# EAGLE board round-display-v1.1 (EAGLE 9.6.2)
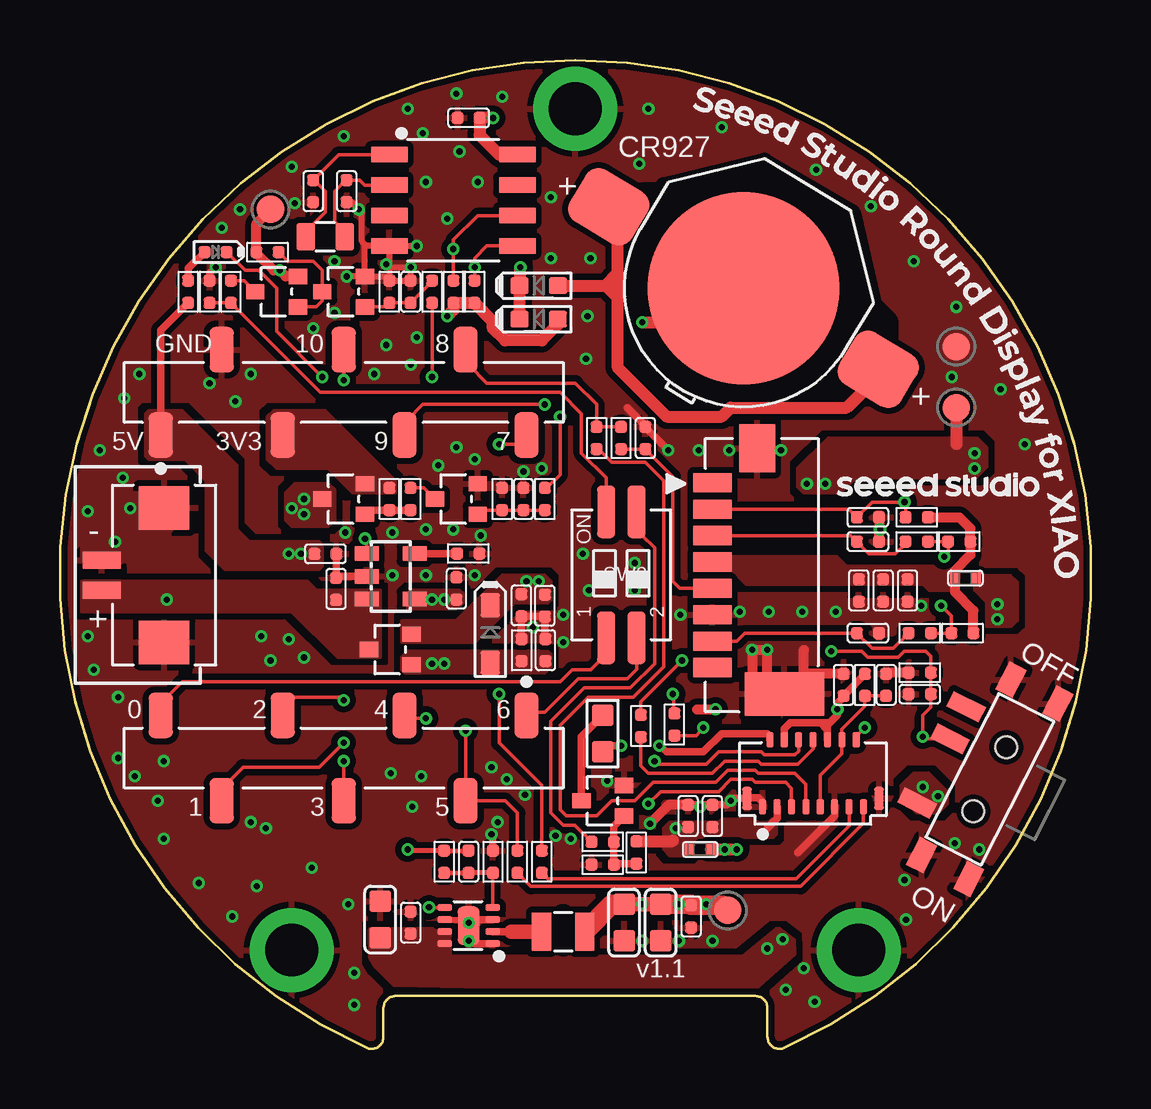
[diagram p0: board, top side]
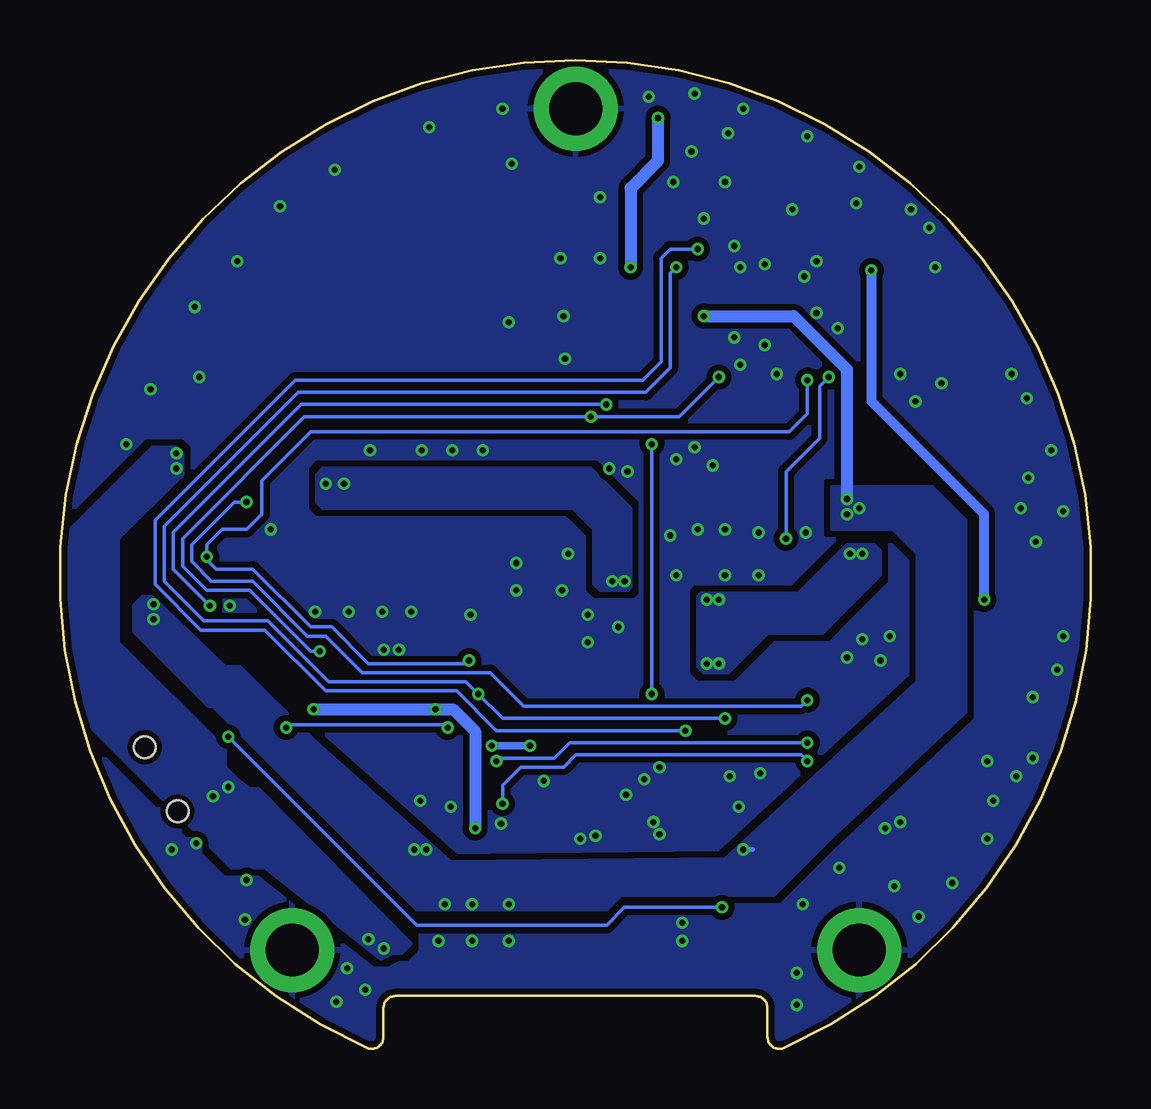
[diagram p1: board, bottom side, seen from below]

Size 42.96 x 41.2 mm. Coordinates in mm from the lower left corner, seen from the top.
Outline: 12.78,0.04 arc114 13.48,0.5 13.48,1.7 arc-90 13.98,2.2 28.98,2.2 arc-90 29.48,1.7 29.48,0.5 arc114 30.18,0.04 arc312 12.78,0.04
Copper layers (1*16): Top 0.035mm / dielectric 1.5mm / Bottom 0.035mm
Design rules "SeeedStudio_2layer_DRU_no_angle_20140221": minimum track width 1mil, minimum drill 10mil, track to track 6mil, track to pad 6mil, pad to pad 6mil, via to via 6mil, smd to smd 0mil, copper to edge 10mil, drill to drill 10mil, minimum pad ring 4mil, minimum via ring 4mil, stop-mask expansion 2mil, vias tented up to drill 25mil, thermal gap 10mil
tRestrict: area 23.9,26.6 to 34.4,35.6; area 25.2,30.8 to 33.9,37; area 20.8,4.1 to 21.1,5.8; area 10.5,33.3 to 11.6,34.3

## Footprints (pad centres in the part's own frame; a part is rotated, then mirrored left to right if it is on the bottom)
BAT2P-SMD-15.3X8.6X2.9MM = smd 3 x 2.5: 1+ -6.55,0; 2+ 6.55,0 | smd 8 x 8: 3- 0,0
C0402 = smd 0.5 x 0.5: 1 -0.463,0; 2 0.463,0
C0603 = smd 0.889 x 0.889: 1 -0.762,0; 2 0.762,0
LED-0402 = smd 0.5 x 0.5: + 0.463,0; - -0.463,0
SOD-323 = smd 1 x 0.8: + 1.2,0; - -1.2,0
ESD-0402 = smd 0.5 x 0.5: 1 -0.463,0; 2 0.463,0
SOD-523 = smd 0.762 x 0.7: + 0.8,0; - -0.8,0
F0402 = smd 0.445 x 0.508: 1 -0.445,0; 2 0.445,0
HW2+2P-SMD-1.25 = smd 0.7 x 1.6: 1 -0.625,0; 2 0.625,0 | smd 1.82 x 2.1: P1 -2.8,-2.6; P2 2.8,-2.6
MICRO-SD8+2P-SMD-1.1-11.41X4.9X3MM = smd 1.6 x 0.8: P1 0,3.85; P2 0,2.75; P3 0,1.65; P4 0,0.55; P5 0,-0.55; P6 0,-1.65; P7 0,-2.75; P8 0,-3.85 | smd 1.5 x 2: S1 1.86,5.28 | smd 3.3 x 1.8: S2 3,-4.95
H7-2.54-18.28X2.5X5MM = smd 1.02 x 1.9: 1 -7.62,-1.78; 2 -5.08,1.78; 3 -2.54,-1.78; 4 0,1.78; 5 2.54,-1.78; 6 5.08,1.78; 7 7.62,-1.78
H1P-3.5/2.2MM-PASTE = drill 2.2 pad 3.5: 1 0,0
FPC15P-0.6-6.1X2.83X1MM = smd 0.3 x 0.65: 1 -2.1,-1.4; 2 -1.8,1.4; 3 -1.5,-1.4; 4 -1.2,1.4; 5 -0.9,-1.4; 6 -0.6,1.4; 7 -0.3,-1.4; 8 0,1.4; 9 0.3,-1.4; 10 0.6,1.4; 11 0.9,-1.4; 12 1.2,1.4; 13 1.5,-1.4; 14 1.8,1.4; 15 2.1,-1.4 | smd 0.4 x 0.95: 16 -2.75,-1.05; 17 2.75,-1.05
L201610 = smd 0.8 x 1.6: 1 -0.9,0; 2 0.9,0
SOT-323 = smd 0.762 x 0.635: 1 0.889,-0.635; 2 0.889,0.635; 3 -0.889,0
R0402 = smd 0.5 x 0.5: 1 -0.463,0; 2 0.463,0
R0603 = smd 0.889 x 0.889: 1 -0.762,0; 2 0.762,0
SW7-SMD-6.7X2.6X1.4MM-90D = smd 0.7 x 1.5: 1 -2.25,2.25; 2 0.75,2.25; 3 2.25,2.25 | smd 1.3 x 0.8: P1 -4.1,1.1; P2 -4.1,-1.1; P3 4.1,-1.1; P4 4.1,1.1 | hole 0.9: -1.5,0; 1.5,0
SW4-SMD-1.27-5.4X4.14X2.3MM = smd 0.76 x 2.2: 1 -0.635,-2.625; 2 0.635,-2.625; 3 0.635,2.625; 4 -0.635,2.625
TP-D45MIL = smd 1.143 x 1.143: T 0,0
DFN8G-0.5-2X2MM = smd 0.3 x 0.6: 1 -0.75,-1; 2 -0.25,-1; 3 0.25,-1; 4 0.75,-1; 5 0.75,1; 6 0.25,1; 7 -0.25,1; 8 -0.75,1 | smd 1.6 x 0.9: 9 0,0
SOT-25 = smd 0.6 x 1: 1 -0.95,-1; 2 0,-1; 3 0.95,-1; 4 0.95,1; 5 -0.95,1
SOP8-1.27-5X3.9MM = smd 0.635 x 1.524: 1 -1.905,-2.667; 2 -0.635,-2.667; 3 0.635,-2.667; 4 1.905,-2.667; 5 1.905,2.667; 6 0.635,2.667; 7 -0.635,2.667; 8 -1.905,2.667
X2-SMD-L2.0X1.2X0.55MM = smd 0.762 x 1.143: 1 -0.813,0; 2 0.813,0

## Placement (x,y rotation side)
BAT1  CR927  [BAT2P-SMD-15.3X8.6X2.9MM]  28.48,31.7 148.9 top
C1  4.7uF  [C0402]  16.52,19.18 270 top
C2  4.7uF  [C0402]  19.22,18.48 90 top
C3  100nF  [C0402]  20.23,16.61 270 top
C5  4.7uF  [C0402]  11.5,19.17 270 top
C7  10uF  [C0603]  13.34,5.39 270 top
C8  100nF  [C0402]  14.61,5.26 270 top
C9  100nF  [C0402]  20.2,18.47 90 top
C10  10uF  [C0603]  25.03,5.26 90 top
C11  10uF  [C0603]  23.5,5.26 90 top
C12  100nF  [C0402]  34.3,19.1 90 top
C13  4.7uF  [C0402]  35.31,19.1 90 top
C14  DNP  [C0402]  11.95,35.74 90 top
C15  18pF  [C0402]  10.55,35.74 270 top
C16  100nF  [C0402]  17.03,38.79 180 top
C17  10uF  [C0402]  27.19,9.7 270 top
C18  100nF  [C0402]  26.17,9.7 270 top
C19  100nF  [C0402]  34.42,15.17 270 top
C20  100nF  [C0402]  32.65,15.17 270 top
C21  100nF  [C0402]  26.3,5.51 90 top
C22  100pF  [C0402]  35.82,14.78 0 top
C23  1uF  [C0402]  19.31,22.91 270 top
C24  100pF  [C0402]  14.61,31.55 270 top
C25  DNP  [C0402]  17.03,7.8 90 top
D1  RED  [LED-0402]  6.48,33.2 180 top
D2  B5819WS  [SOD-323]  17.93,17.29 270 top
D3  ESD9B3.3ST5G  [ESD-0402]  33.28,19.1 90 top
D4  1N4148WT  [SOD-523]  19.95,30.41 0 top
D5  1N4148WT  [SOD-523]  19.95,31.8 0 top
D6  ESDPSA0402V05  [ESD-0402]  33.66,22.15 180 top
D7  ESDPSA0402V05  [ESD-0402]  11.06,20.63 180 top
D8  ESDPSA0402V05  [ESD-0402]  33.66,17.32 180 top
D9  ESDPSA0402V05  [ESD-0402]  24.39,25.45 270 top
D10  ESDPSA0402V05  [ESD-0402]  33.66,21.13 180 top
FB1  120R/2A  [F0402]  37.73,19.61 180 top
FB2  120R/2A  [F0402]  26.68,8.31 180 top
FR1  SEEEDSTUDIO-OPEN-SCH-FRAME  [SEEEDSTUDIO-PCB-FRAME]  -2.71,-32.29 0 top  (outside the outline)
FR2  SEEEDSTUDIO-OPEN-SCH-FRAME  [SEEEDSTUDIO-PCB-FRAME]  -2.71,-24.67 0 top  (outside the outline)
FR3  SEEEDSTUDIO-OPEN-SCH-FRAME  [SEEEDSTUDIO-PCB-FRAME]  -2.71,-17.05 0 top  (outside the outline)
FR4  SEEEDSTUDIO-OPEN-SCH-FRAME  [SEEEDSTUDIO-PCB-FRAME]  -2.71,-9.43 0 top  (outside the outline)
J1  BAT  [HW2+2P-SMD-1.25]  1.74,19.74 90 top
J2  ST-TF-003D-3-2  [MICRO-SD8+2P-SMD-1.1-11.41X4.9X3MM]  27.19,19.74 0 top
J4  ST-FH-254-0114  [H7-2.54-18.28X2.5X5MM]  11.82,27.36 0 top
J5  ST-FH-254-0114  [H7-2.54-18.28X2.5X5MM]  11.82,12.12 180 top
J6  [H1P-3.5/2.2MM-PASTE]  33.28,4.12 0 top
J7  [H1P-3.5/2.2MM-PASTE]  9.66,4.12 0 top
J8  [H1P-3.5/2.2MM-PASTE]  21.47,39.17 0 top
J9  [FPC15P-0.6-6.1X2.83X1MM]  31.38,11.48 0 top
L2  1uH  [L201610]  20.96,4.88 0 top
Q1  CJ3134KW  [SOT-323]  22.61,10.34 0 top
Q2  CJ3134KW  [SOT-323]  16.52,22.91 0 top
Q3  CJ2101  [SOT-323]  11.82,22.91 0 top
Q4  CJ2101  [SOT-323]  9.02,31.55 0 top
Q5  CJ3134KW  [SOT-323]  11.82,31.55 0 top
Q6  CJ2101  [SOT-323]  13.76,16.64 0 top
R1  470K  [R0402]  35.82,15.67 0 top
R2  2.4K  [R0402]  17.01,20.64 180 top
R3  100K  [R0402]  19.24,16.61 270 top
R5  5.1K  [R0402]  20.2,22.91 270 top
R6  2K  [R0402]  5.34,31.55 270 top
R7  470K  [R0402]  8.64,33.2 180 top
R8  100K  [R0402]  16.01,7.8 90 top
R9  0R  [R0402]  14.61,22.91 270 top
R10  4.7K  [R0402]  37.6,17.32 0 top
R11  4.7K  [R0402]  37.47,21.13 0 top
R12  4.7K  [R0402]  35.69,22.15 0 top
R13  470K  [R0402]  13.72,22.91 90 top
R14  33R  [R0402]  35.82,17.32 0 top
R15  33R  [R0402]  23.38,25.45 90 top
R16  33R  [R0402]  35.69,21.13 0 top
R17  10R  [R0603]  22.61,13.13 270 top
R18  100K  [R0402]  24.01,8.18 90 top
R19  1K  [R0402]  22.61,8.62 0 top
R20  4.7K  [R0402]  15.5,31.55 90 top
R21  470K  [R0402]  18.42,22.91 270 top
R22  0R  [R0402]  22.36,25.45 270 top
R23  0R  [R0402]  24.2,13.45 270 top
R24  0R  [R0402]  19.06,7.8 270 top
R25  0R  [R0402]  25.6,13.51 270 top
R26  470K  [R0402]  13.72,31.55 270 top
R27  10K  [R0402]  33.54,15.17 90 top
R28  470K 1%  [R0402]  7.12,31.55 90 top
R29  470K 1%  [R0402]  6.23,31.55 270 top
R30  4.7K  [R0402]  17.28,31.55 270 top
R31  4.7K  [R0402]  16.39,31.55 270 top
R32  0R  [R0402]  20.07,7.8 270 top
R33  DNP  [R0402]  22.61,7.67 0 top
R34  22K  [R0402]  18.04,7.8 270 top
SW1  DHT-1200S  [SW7-SMD-6.7X2.6X1.4MM-90D]  38.74,11.23 63 top
SW2  311080226  [SW4-SMD-1.27-5.4X4.14X2.3MM]  23.39,19.75 0 top
TP1  [TP-D45MIL]  8.77,34.98 270 top
TP2  [TP-D45MIL]  37.35,26.72 90 top
TP4  [TP-D45MIL]  37.35,29.26 90 top
TP6  [TP-D45MIL]  27.82,5.77 180 top
U1  ETA3410  [DFN8G-0.5-2X2MM]  17.03,5.13 90 top
U2  ETA4054S2F  [SOT-25]  13.77,19.69 270 top
U4  PCF8563  [SOP8-1.27-5X3.9MM]  16.39,35.36 270 top
U$1  [LOGO-SEEED-NEW-0.94X8.4MM]  32.39,23.04 0 top
X1  32.768KHz/306010020  [X2-SMD-L2.0X1.2X0.55MM]  11.06,33.83 180 top

## Library data of the parts
BAT1 J1 J2 J4-J9 = Connector-new
C1-C3 C5 C7-C25 D1-D10 FB1 FB2 L2 Q1-Q6 R1-R3 R5-R34 X1 = Discrete-new
FR1-FR4 = moudle-new
SW1 SW2 = Switch
TP1 TP2 TP4 TP6 = Discrete-new; PARTNO: DNP
U1 U2 = PMIC
U4 = IC-new
U$1 = logo

## Nets
A0/BAT: J5.7 SW2.1
BAT_READ: R28.1 R29.2 SW2.4
BG_LIGHT: R19.1 SW2.3
D1/LCD_CS: J5.6 J9.6
D2/SD_CS: D6.2 J2.P2 J5.5 R12.1
D3/LCD_DC: J5.4 J9.5
D4/SDA: J5.3 R25.1 R30.1 U4.5
D5/SCL: J5.2 R24.1 R31.1 U4.6
D6/TX: J5.1 SW2.2
D7/TP_INT: J4.7 R32.1
D8/SCK: J4.6 R15.2 R22.1
D9/MISO: J4.5 R10.1 R14.2
D10/MOSI: J4.4 R11.1 R16.2 R23.1
GND: BAT1.3- C1.1 C2.1 C3.1 C5.1 C7.1 C8.1 C9.1 C10.1 C11.1 C12.1 C13.1 C14.1 C15.2 C16.2 C17.1 C18.1 C19.1 C20.1 C21.1 C22.1 C23.1 C24.1 D3.1 D6.1 D7.1 D8.1 D9.1 D10.1 J1.2 J1.P1 J1.P2 J2.P6 J2.S1 J2.S2 J4.2 J6.1 J7.1 J8.1 J9.1 J9.11 J9.16 J9.17 Q1.2 Q2.2 Q5.2 R1.1 R2.1 R3.1 R21.1 R26.1 R29.1 R33.1 R34.1 SW1.P1 SW1.P2 SW1.P3 SW1.P4 TP4.T U1.1 U1.3 U1.6 U1.9 U2.2 U4.4
LCD_3V3: C17.2 C18.2 C20.2 FB2.2 J9.3 J9.4 J9.10 R18.2 R27.2
LCD_RST: C19.2 J9.9 J9.12 R27.1
LEDK: J9.2 R17.2
N$1: R2.2 U2.5
N$2: J9.13 R32.2
N$3: D1.+ R6.1
N$4: C25.1 R8.1 R34.2 U1.4
N$5: D1.- U2.1
N$8: Q4.3 R28.2
N$10: C23.2 Q2.1 R5.2 R21.2
N$12: L2.1 U1.2
N$13: Q4.1 Q5.3 R7.1
N$14: Q3.1 R9.2 R13.1
N$15: C14.2 U4.2 X1.1
N$16: Q2.3 R9.1
N$17: D8.2 J2.P7 R14.1
N$18: D9.2 J2.P5 R15.1
N$19: D10.2 J2.P3 R16.1
N$20: C15.1 U4.1 X1.2
N$21: Q1.1 R18.1 R19.2 R33.2
N$22: J9.7 R22.2
N$23: Q1.3 R17.1
N$24: C16.1 D4.- D5.- U4.8
N$25: J9.8 R23.2
N$26: BAT1.1+ BAT1.2+ D5.+
N$27: C24.2 Q5.1 R20.2 R26.2
N$32: J9.14 R25.2
N$33: J9.15 R24.2
PWR_EN: C22.2 R1.2 R5.1 R20.1 SW1.2 U1.5
SYS_3V3: C10.2 C11.2 C21.2 C25.2 D4.+ FB1.1 FB2.1 L2.2 Q3.3 R8.2 R30.2 R31.2 TP6.T
USB_5V: C1.2 C3.2 D2.+ D7.2 J4.1 Q6.1 R3.2 R6.2 U2.4
VBAT: C5.2 J1.1 Q4.2 Q6.3 R7.2 TP1.T U2.3
VDD_3V3_SD: C12.2 C13.2 D3.2 FB1.2 J2.P4 R10.2 R11.2 R12.2
VSYS: C2.2 C7.2 C8.2 C9.2 D2.- Q6.2 SW1.1 TP2.T U1.7 U1.8
XIAO_3V3: J4.3 Q3.2 R13.2

## Tracks (layer width: path | path; a pad name or v marks a point on that pad's centre or on a via)
A0/BAT
  Top 0.152: SW2.1 22.75,16.45 22.11,15.8 21.34,15.8 20.84,15.29 5.09,15.29 4.33,14.53 4.33,14.02 J5.7
BAT_READ
  Top 0.152: R29.2 R28.1 10.85,27.36 20.84,27.36 21.72,26.47 21.72,24.82 22.75,23.79 SW2.4
BG_LIGHT
  Top 0.152: SW2.3 24.26,22.13 24.26,21.39 24.77,20.88 24.77,16.05 23.76,15.04 21.85,15.04 20.45,13.64 20.45,9.83 20.96,9.32 21.45,9.32 R19.1
D1/LCD_CS  (via drill 0.25 pad 0.51)
  Top 0.152: J5.6 6.74,10.85 7.63,11.74 10.8,11.74 v11.82,12.75 | J9.6 30.78,12.41 30.61,12.24 29.34,12.24 29.22,12.37 27.44,12.37 26.93,11.86 24.9,11.86 v24.77,11.99
  Bottom 0.152: v11.82,12.75 21.72,12.75 22.36,12.12 24.65,12.12 v24.77,11.99
D2/SD_CS  (via drill 0.25 pad 0.51)
  Top 0.152: J5.5 9.28,14.15 9.79,14.66 11.69,14.66 v11.82,14.53 | J2.P2 32.86,22.49 D6.2 33.83,22.79 v35.19,22.79 35.23,22.74 R12.1
  Bottom 0.152: v35.19,22.79 35.69,22.79 37.47,21.01 37.47,20.31 36.65,19.48 34.93,19.48 32.65,17.2 31.88,17.2 30.36,15.67 25.03,15.67 23.63,14.28 12.07,14.28 v11.82,14.53
D3/LCD_DC  (via drill 0.25 pad 0.51)
  Top 0.152: J9.5 30.48,10.86 30.23,11.1 28.96,11.1 28.84,11.23 27.95,11.23 27.44,10.72 25.03,10.72 v24.52,10.21 | J5.4 v11.82,11.99
  Bottom 0.152: v11.82,11.99 12.07,12.24 21.47,12.24 21.98,11.74 23.76,11.74 24.52,10.97 v24.52,10.21
D4/SDA  (via drill 0.25 pad 0.51)
  Top 0.152: 14.36,13.51 J5.3 14.49,13.77 v15.25,13.77 | U4.5 17.79,33.45 17.28,32.95 v17.28,32.56 R30.1 | R25.1 25.58,13.98 25.58,14.74 v25.53,14.78
  Bottom 0.152: v17.28,32.56 17.53,32.31 17.53,28.37 18.55,27.36 33.03,27.36 38.62,21.77 38.62,19.48 36.96,17.83 34.3,17.83 31.76,15.29 26.04,15.29 v25.53,14.78 24.52,13.77 v15.25,13.77
D5/SCL  (via drill 0.25 pad 0.51)
  Top 0.152: R31.1 v16.39,33.33 16.39,33.71 17.41,34.72 U4.6 | v16.9,13.26 J5.2 18.55,10.34 19.06,9.83 R24.1
  Bottom 0.152: v16.39,33.33 17.53,33.33 17.91,32.95 17.91,28.63 18.68,27.87 33.15,27.87 39,22.02 39,19.36 37.09,17.45 34.42,17.45 31.88,14.91 26.42,14.91 24.77,13.26 v16.9,13.26
D6/TX
  Top 0.152: 19.57,14.4 19.44,14.4 J5.1 19.56,14.02 20.2,14.02 21.6,15.42 23.63,15.42 24.02,15.81 SW2.2
D7/TP_INT  (via drill 0.25 pad 0.51)
  Top 0.152: 19.44,25.96 J4.7 19.06,25.2 v18.3,25.2 | R32.1 20.07,10.97 18.3,12.75 v18.3,14.78
  Bottom 0.152: v18.3,14.78 v18.3,25.2
D8/SCK
  Top 0.152: R15.2 R22.1 22.36,26.85 21.47,27.74 17.79,27.74 17.03,28.5 17.03,29.01 J4.6
D9/MISO  (via drill 0.25 pad 0.51)
  Top 0.152: R14.2 R10.1 37.14,18.04 v36.71,18.47 | v20.2,26.85 15.12,26.85 14.49,26.21 14.49,25.7 J4.5
  Bottom 0.152: v36.71,18.47 38.23,19.99 38.23,21.52 32.9,26.85 v20.2,26.85
D10/MOSI  (via drill 0.25 pad 0.51)
  Top 0.152: R16.2 R11.1 37.01,20.67 v36.84,20.5 | J4.4 v11.82,27.87 | R23.1 24.2,14.47 v25.92,16.18
  Bottom 0.152: v11.82,27.87 11.82,26.47 12.58,25.71 32.52,25.71 34.55,23.67 34.55,22.28 35.19,21.64 36.2,21.64 36.84,21.01 v36.84,20.5 36.84,20.37 36.46,19.99 34.93,19.99 32.52,17.58 31.63,17.58 30.11,16.05 26.04,16.05 v25.92,16.18
GND  (via drill 0.25 pad 0.51)
  Top 0.254: U4.4 12.77,33.45 12.58,33.64 12.58,34.85 v12.45,34.98 12.15,35.28 C14.1 | Q5.2 v11.95,32.18 | Q5.2 13.55,32.18 R26.1 C24.1 v14.61,32.56 13.72,32.56 | U4.4 v14.87,33.45 | U4.4 13.72,32.56 | 13.72,32.56 13.72,31.93 | Q5.2 12.71,33.45 | U1.6 16.9,5.38 v17.03,5.26
  Top 0.305: D10.1 34.13,21.12 | J9.1 29.28,10.28 29.09,10.47 28.66,10.47 J9.16 28.04,10.43 v27.95,10.34 27.77,10.17 C17.1 26.76,10.17 v26.68,10.09 26.6,10.17 C18.1 | 25.36,10.17 25.3,10.17 | U1.3 17.15,5.38 v17.03,5.26 | U1.1 17.27,4.38 17.03,4.62 U1.9 | J9.11 32.28,9.72 30.74,8.18 | R34.1 18.04,8.88 v17.98,8.94 | U2.2 11.56,19.69 C5.1 11.52,19.65 D7.1 | R29.1 6.23,32.31 v6.48,32.56 | 19.31,17.07 19.22,17.16 C2.1 20.19,18.02 C9.1 20.2,17.07 | v25.34,24.94 24.39,25.9 D9.1 24.39,25.96 23.63,26.72
  Top 0.406: D6.1 34.13,21.69 v34.17,21.64 34.13,21.6 D10.1 | R1.1 34.47,15.67 C19.1 | C20.1 31.04,15.63 31,15.67 31,16.63 | J2.S2 30.1,14.79 29.47,15.42 29.47,16.56 | 29.47,16.56 v29.47,16.63 | 29.09,15.17 28.84,15.42 v28.84,16.63 29.41,16.63 29.47,16.56 | C18.1 25.36,10.17 v24.58,9.39
  Top 0.508: v24.26,30.28 27.06,30.28 BAT1.3-
  other vias: 30.23,2.47 4.33,11.99 4.33,8.75 28.33,18.21 29.54,18.21 30.93,18.21 32.33,18.21 35.89,18.47 6.23,27.74 15.25,36.12 15.12,38.15 18.42,39.68 30.04,24.94 27.88,24.94 26.61,24.94 2.42,12.12 2.42,14.66 1.15,17.2 2.29,21.13 1.15,22.4 1.66,24.94 2.67,27.1 3.31,28.12 4.07,10.34 35.25,5.39 40.2,25.2 37.16,27.99 17.41,36.12 24.52,39.17 27.57,38.41 31.5,36.63 33.79,35.1 35.57,32.82 37.35,30.91 37.28,8.56 2.93,22.53 31.44,1.96 38.3,8.31 3.12,11.36 8.2,6.78 5.79,6.91 12.26,1.83 7.18,5.51 31,3.35 35.19,7.04 39.19,27.48 16.14,34.6 6.74,34.22 7.5,34.98 9.66,36.76 11.82,38.03 14.49,39.17 16.52,39.8 16.64,37.39 21.98,30.53 22.11,32.95 20.45,32.95 20.45,35.49 24.14,36.88 9.79,35.23 11.44,32.82 11.44,30.66 10.55,30.02 13.6,32.69 13.09,28.12 14.87,29.64 14.61,28.5 13.6,29.33 17.03,4.5 24.26,4.5 25.79,4.5 27.19,4.5 7.95,9.45 8.58,9.2 12.26,3.16 22.8,11.16 13.85,19.74 15.25,19.74 17.28,19.74 17.53,21.39 13.85,21.52 15.25,21.64 16.39,21.64 15.76,24.31 17.28,24.56 19.31,24.06 20.07,24.18 20.96,18.09 20.96,16.94 21.28,8.75 20.65,8.88 12.01,6.02 10.49,7.55 18.23,9.45 13.79,11.48 15.06,11.36 14.68,10.09 17.98,11.74 18.61,11.23 19.38,10.59 21.92,28.75 21.79,20.63 23.95,20.25 23.95,19.1 22.04,19.1 25.85,18.09 7.95,28.12 7.31,26.98 11.88,21.52 2.61,23.8 1.4,15.8 8.39,17.2 8.77,16.18 10.17,16.31 19.69,17.58 9.53,17.07 16.52,25.07
  pour Bottom (isolate 0.254, rank 6): -0.12,41.33 43.06,41.33 43.06,0.05 1.79,0.05 1.79,-0.58 -0.12,-0.58
  pour Top (isolate 0.254, rank 6): 43.06,41.33 43.06,0.05 -0.12,0.05 -0.12,41.33
  pour Top (isolate 0.254, rank 6, no thermals): 35.19,18.72 30.74,18.72 30.61,18.59 30.61,18.09 30.87,17.83 33.66,17.83 33.92,17.58 33.92,17.32 34.04,17.2 34.42,17.2 35.06,17.83 35.82,17.83 35.95,17.96 35.95,18.47 35.69,18.72
  pour Top (no thermals): 2.67,20.37 3.93,20.37 arc90 4.58,21.02 4.58,21.52 5.21,22.15 5.21,22.91 4.96,23.17 1.28,23.17 0.9,22.79 0.9,20.5 1.15,20.25 2.55,20.25
  pour Top (isolate 0.254, rank 6, no thermals): 18.93,16.94 20.71,16.94 20.84,17.07 20.84,18.09 20.71,18.21 19.06,18.21 18.8,17.96 18.8,17.07
LCD_3V3  (via drill 0.25 pad 0.51)
  Top 0.305: J9.10 31.98,13.48 32.07,13.58 | 32.07,13.58 32.39,13.9 v32.39,14.15 32.39,14.4 32.65,14.66 C20.2 32.65,14.72 33.54,15.61 R27.2 | J9.4 30.18,13.33 30.42,13.58 31.69,13.58 | 31.69,13.58 32.07,13.58 | 31.69,13.58 31.95,13.32 | J9.3 29.88,9.6 29.47,9.2
  Top 0.406: 26.55,14.15 v27.31,14.15
  Top 0.508: R18.2 25.49,8.64 25.53,8.69
  Bottom 0.508: v32.39,14.15 v27.31,14.15 26.58,14.15 25.66,13.23 v25.66,9.2
  pour Top (isolate 0.254, no thermals): 27.44,9.45 25.41,9.45 25.15,9.2 25.15,8.31 25.41,8.05 26.17,8.05 26.36,8.24 26.36,8.62 26.55,8.82 29.73,8.82 29.85,8.94 29.85,9.45 29.73,9.58 27.57,9.58
LCD_RST
  Top 0.152: J9.9 31.68,11.4 32.58,12.3 J9.12 32.58,13.32 33.54,14.28 R27.1 C19.2
LEDK  (via drill 0.25 pad 0.51)
  Top 0.305: J9.2 29.58,13.03 29.47,13.13 27.57,13.13 26.8,12.37 25.28,12.37 v24.96,12.63 | 22.36,12.37 R17.2 22.87,12.63 v23.38,12.63
  Bottom 0.305: v24.96,12.63 v23.38,12.63
N$1
  Top 0.305: R2.2 15.03,20.64 U2.5
N$2
  Top 0.152: J9.13 32.88,9.3 30.67,7.09 20.32,7.09 R32.2
N$3
  Top 0.305: R6.1 5.34,32.52 D1.+
N$4
  Top 0.152: U1.4 18.03,7.32 R34.2
  Top 0.203: R34.2 C25.1 R8.1
N$5  (via drill 0.25 pad 0.51)
  Top 0.152: U2.1 12.77,21.19 v12.71,21.26 | v10.93,27.99 9.02,29.9 9.02,31.7 8.28,32.44 7.71,32.44 D1.-
  Bottom 0.152: v12.71,21.26 12.71,24.06 11.31,25.45 11.31,27.61 v10.93,27.99
N$8
  Top 0.152: R28.2 7.67,32.01 Q4.3
N$10
  Top 0.152: R5.2 C23.2 R21.2 17.58,22.45 Q2.1
N$12
  Top 0.305: U1.2 18.8,4.88 | 20.2,4.88 20.07,4.88 19.95,4.88
  Top 0.61: 18.8,4.88 19.95,4.88 L2.1
N$13
  Top 0.152: Q4.1 10.68,30.91 10.93,31.17 Q5.3 10.93,32.44 10.55,32.82 9.49,32.82 R7.1
N$14
  Top 0.305: R9.2 R13.1 12.88,22.45 Q3.1
N$15
  Top 0.152: U4.2 12.71,35.99 12.5,36.2 C14.2 11.9,36.2 11.44,35.74 11.44,34.47 11.56,34.34 11.69,34.22 11.87,34.04 X1.1
N$16
  Top 0.152: R9.1 15.17,23.38 Q2.3
N$17
  Top 0.152: J2.P7 28.2,16.99 28.54,17.32 D8.2 | D8.2 33.2,17.28 | D8.2 33.83,16.69 34.72,16.69 R14.1
N$18
  Top 0.152: J2.P5 25.83,19.19 25.53,19.48 25.53,23.85 D9.2 R15.1
N$19
  Top 0.152: J2.P3 32.95,21.39 D10.2 33.71,20.63 34.81,20.63 35.23,21.05 R16.1
N$20
  Top 0.152: U4.1 11.61,37.26 C15.1 10.59,36.2 11.06,35.74 11.06,34.85 10.24,34.04 X1.2
N$21
  Top 0.305: R18.1 23.12,7.72 R33.2 R19.2 23.08,9.28 Q1.1
N$22
  Top 0.152: J9.7 31.08,11.02 30.61,11.48 29.09,11.48 28.96,11.61 27.82,11.61 27.31,11.1 24.71,11.1 23.95,10.34 22.99,10.34 22.36,9.7 21.09,9.7 20.84,9.96 20.84,13.49 22.01,14.66 23.88,14.66 25.15,15.93 25.15,23.67 24.39,24.44 22.99,24.44 22.44,24.99 R22.2
N$23
  Top 0.305: Q1.3 21.72,13.01 R17.1
N$24  (via drill 0.25 pad 0.51)
  Top 0.508: D4.- D5.- 19.15,31.89 19.18,32.31 v19.18,32.56 | v18.04,38.79 C16.1 17.49,38.07 18.3,37.26 U4.8
  Bottom 0.508: v18.04,38.79 18.04,37.01 19.18,35.87 v19.18,32.56
N$25
  Top 0.152: J9.8 31.38,12.5 30.74,11.86 29.22,11.86 29.09,11.99 27.69,11.99 27.19,11.48 24.52,11.48 24.2,11.8 R23.2
N$26
  Top 0.508: BAT1.1+ 34.09,28.04 32.77,26.72 27.95,26.72 27.57,26.34 25.28,26.34 23.25,28.37 23.25,31.29 | 23.25,31.29 23.25,31.8 | 23.25,31.8 23.25,32.31 | 23.25,32.31 23.25,34.7 BAT1.2+ | D5.+ 22.74,31.8 | 22.74,31.8 23.25,31.8 | 22.74,31.8 23.25,32.31 | 22.74,31.8 23.25,31.29
N$27
  Top 0.152: R20.2 15.5,31.98 C24.2 R26.2 13.55,30.91 Q5.1
N$32  (via drill 0.25 pad 0.51)
  Top 0.152: R25.2 26.51,13.05 v26.8,13.39 | J9.14 33.18,13.03 v33.54,13.39
  Bottom 0.152: v26.8,13.39 26.93,13.51 33.41,13.51 v33.54,13.39
N$33
  Top 0.152: J9.15 33.48,9.39 30.86,6.77 19.62,6.77 R24.2
PWR_EN  (via drill 0.25 pad 0.51)
  Top 0.152: v32.14,16.56 33.41,16.56 33.66,16.31 34.93,16.31 35.19,16.56 36.08,16.56 36.28,16.35 R1.2 C22.2 36.28,14.23 35.95,13.9 v35.95,13.01 36.04,12.92 SW1.2 | U1.5 15.39,5.88 v15.37,5.89 | R20.1 v15.5,27.99 | R5.1 20.28,23.38 20.84,23.93 v20.84,26.34
  Bottom 0.152: v15.5,27.99 17.15,26.34 v20.84,26.34 32.77,26.34 37.85,21.26 37.85,20.12 36.84,19.1 35.06,19.1 32.52,16.56 v32.14,16.56 | v35.95,13.01 28.09,5.15 20.19,5.15 19.44,5.89 v15.37,5.89
SYS_3V3  (via drill 0.25 pad 0.51)
  Top 0.203: R8.2 C25.2 | R8.2 15.55,8.26 | R8.2 14.53,8.26 v14.49,8.31
  Top 0.508: v16.14,30.53 16.39,30.79 R31.2 17.23,31.09 17.28,31.04 R30.2 18.04,30.32 18.04,30.02 18.55,29.52 20.07,29.52 20.75,30.19 D4.+ | FB2.1 v27.69,8.31 v28.2,8.31
  Top 0.61: C10.2 C11.2
  Top 0.813: C11.2 22.99,6.02 L2.2 | C10.2 v25.79,6.02 26.25,6.02 C21.2 27.61,5.98 TP6.T
  Bottom 0.203: v14.49,8.31 14.1,8.31
  Bottom 0.508: v16.14,30.53 12.39,30.53 10.17,28.31 v10.17,22.91
  other vias: 39.06,18.53 39.06,17.9 24.26,6.02 26.93,6.02 10.17,22.28 9.66,22.53
  pour Bottom (isolate 0.254, no thermals): 11.06,8.56 13.22,6.4 19.57,6.4 20.18,5.79 28.1,5.79 36.58,14.28 36.78,14.28 39.89,17.38 39.89,18.49 39.53,18.85 39.12,18.85 36.08,15.93 35.44,15.93 32.27,12.75 26.68,7.8 15.25,7.93 7.25,15.29 7.25,20.63 8.26,21.64 10.8,21.64 10.8,23.42 6.61,23.42 5.21,22.02 5.21,14.02
  pour Top (isolate 0.254, no thermals): 38.23,19.74 39.6,19.74 39.89,19.45 39.89,17.83 39.63,17.58 38.62,17.58 38.62,18.59 38.11,19.1 38.11,19.61
  pour Top (isolate 0.254, no thermals): 9.79,23.55 11.18,23.55 11.44,23.29 11.44,22.02 11.18,21.77 9.66,21.77 9.41,22.02 9.41,23.17
USB_5V  (via drill 0.25 pad 0.51)
  Top 0.305: J4.1 4.2,29.94 R6.2
  other vias: 16.01,18.72 15.5,18.72 10.04,20.63 9.53,20.63 15.5,16.05 16.01,16.05
  pour Top (isolate 0.203, no thermals): 14.36,15.67 20.2,15.67 20.45,15.93 20.45,16.44 20.33,16.56 14.49,16.56 14.23,16.31 14.23,15.8
  pour Top (isolate 0.203, no thermals): 14.49,18.34 16.52,18.34 16.77,18.59 16.77,18.98 16.64,19.1 14.61,19.1 14.49,18.98
  pour Top (isolate 0.203, no thermals): 3.69,24.56 5.21,24.56 6.1,23.67 6.1,20.75 6.87,19.99 10.8,19.99 10.93,20.12 10.93,21.01 10.8,21.13 7.88,21.13 7.37,21.64 7.37,24.31 5.09,26.6 3.69,26.6 3.56,26.47 3.56,24.69
  pour Bottom (isolate 0.254, no thermals): 15.12,15.67 16.14,15.67 16.39,15.93 16.39,18.85 16.26,18.98 12.2,18.98 10.17,21.01 9.02,21.01 8.77,20.75 8.77,19.74 10.42,18.09 11.18,17.32 13.47,17.32
VBAT  (via drill 0.25 pad 0.51)
  Top 0.406: Q4.2 9.41,32.18 v9.15,32.44 8.9,32.44 8.18,33.15 R7.2 8.18,34.39 TP1.T
  Bottom 0.406: v4.45,18.72 4.45,22.28 9.15,26.98 v9.15,32.44
  pour Top (isolate 0.152, no thermals): 0.9,19.48 10.29,19.48 10.68,19.1 13.34,19.1 13.34,16.31 11.56,16.31 9.66,18.21 0.9,18.21
VDD_3V3_SD
  Top 0.406: R10.2 38.06,18.26 37.28,19.04 FB1.2 37.28,19.93 37.94,20.58 R11.2 37.94,21.69 37.47,22.15 R12.2
  pour Top (isolate 0.254, no thermals): 37.47,20.12 32.77,20.12 32.39,20.5 26.93,20.5 26.8,20.37 26.8,20.18 26.93,20.05 27.88,20.05 28.58,19.36 35.95,19.36 36.2,19.1 37.09,19.1 37.22,19.23 37.22,19.36 37.47,19.61
VSYS  (via drill 0.25 pad 0.51)
  Top 0.508: TP2.T 37.35,25.2
  Top 0.61: 13.3,4.58 C7.2
  other vias: 36.58,10.53 35.95,10.91 31.88,23.55 31.12,23.55 38.11,24.82 30.11,4.56 29.47,4.18 19.44,19.48 19.95,19.48 38.11,24.18
  pour Top (isolate 0.254, no thermals): 20.45,2.59 28.94,2.47 30.62,3.94 30.59,4.56 29.98,5.01 29.85,5.01 28.46,3.86 16.26,3.86 16.26,5.01 12.9,5.01 12.9,3.82 13.16,3.39 13.91,2.66 19.76,2.53
  pour Bottom (isolate 0.254, no thermals): 42.93,14.66 35.82,7.55 34.42,7.55 29.6,3.74 29.09,3.99 28.71,3.99 28.33,4.37 34.68,10.85 35.06,10.85 35.57,11.23 36.08,11.74 36.08,12.5 40.52,16.94 40.52,21.26 37.85,23.93 37.85,24.82 38.11,25.07 39.12,25.07 42.93,21.26
  pour Top (isolate 0.254, no thermals): 31,23.17 32.52,23.17 33.15,23.8 38.16,23.8 38.62,24.26 38.62,25.05 38.21,25.45 32.01,25.45 30.74,24.18 30.74,23.42
  pour Top (isolate 0.254, no thermals): 35.31,10.21 35.06,10.47 35.06,10.97 35.57,11.48 36.2,11.48 36.96,10.72 36.96,10.21 36.58,9.83 35.69,9.83
  pour Top (isolate 0.203, no thermals): 14.23,16.94 17.28,16.94 18.93,18.59 20.33,18.59 20.45,18.72 20.45,19.48 20.2,19.74 18.42,19.74 16.52,17.83 14.23,17.83
  pour Bottom (isolate 0.254, no thermals): 19.18,19.23 19.18,22.53 20.84,24.18 32.01,24.18 32.27,23.93 32.27,22.79 32.01,22.53 21.6,22.53 20.71,21.64 20.71,19.36 20.45,19.1 19.31,19.1
XIAO_3V3
  pour Top (isolate 0.254, no thermals): 13.98,23.17 12.2,23.17 11.56,23.8 11.18,24.18 9.02,24.18 8.64,24.56 8.64,26.34 8.9,26.6 11.06,26.6 13.98,23.67

## Text on the board
tNames: CR927 | + | GND | 10 | 8 | + | 5V | 3V3 | 9 | 7 | - | + | OFF | 0 | 2 | 4 | 6 | 1 | 3 | 5 | ON | v1.1